# Altium PCB PCB.PcbDoc (part 3 of 7)
Units mm, origin at the board's own origin, x right, y up, seen from the top; angles counter-clockwise.
Board outline 78.8 x 69 mm, 12 copper layers (Top Layer, GND_12, uStrip1, GND_35, Clocks, GND_57, POWER, Slow_Ctrl, GND_810, uStrip2, GND_1012, Bottom Layer), stack 2.926 mm thick; 290 components, 212 nets, 1379 pads, 3418 vias.
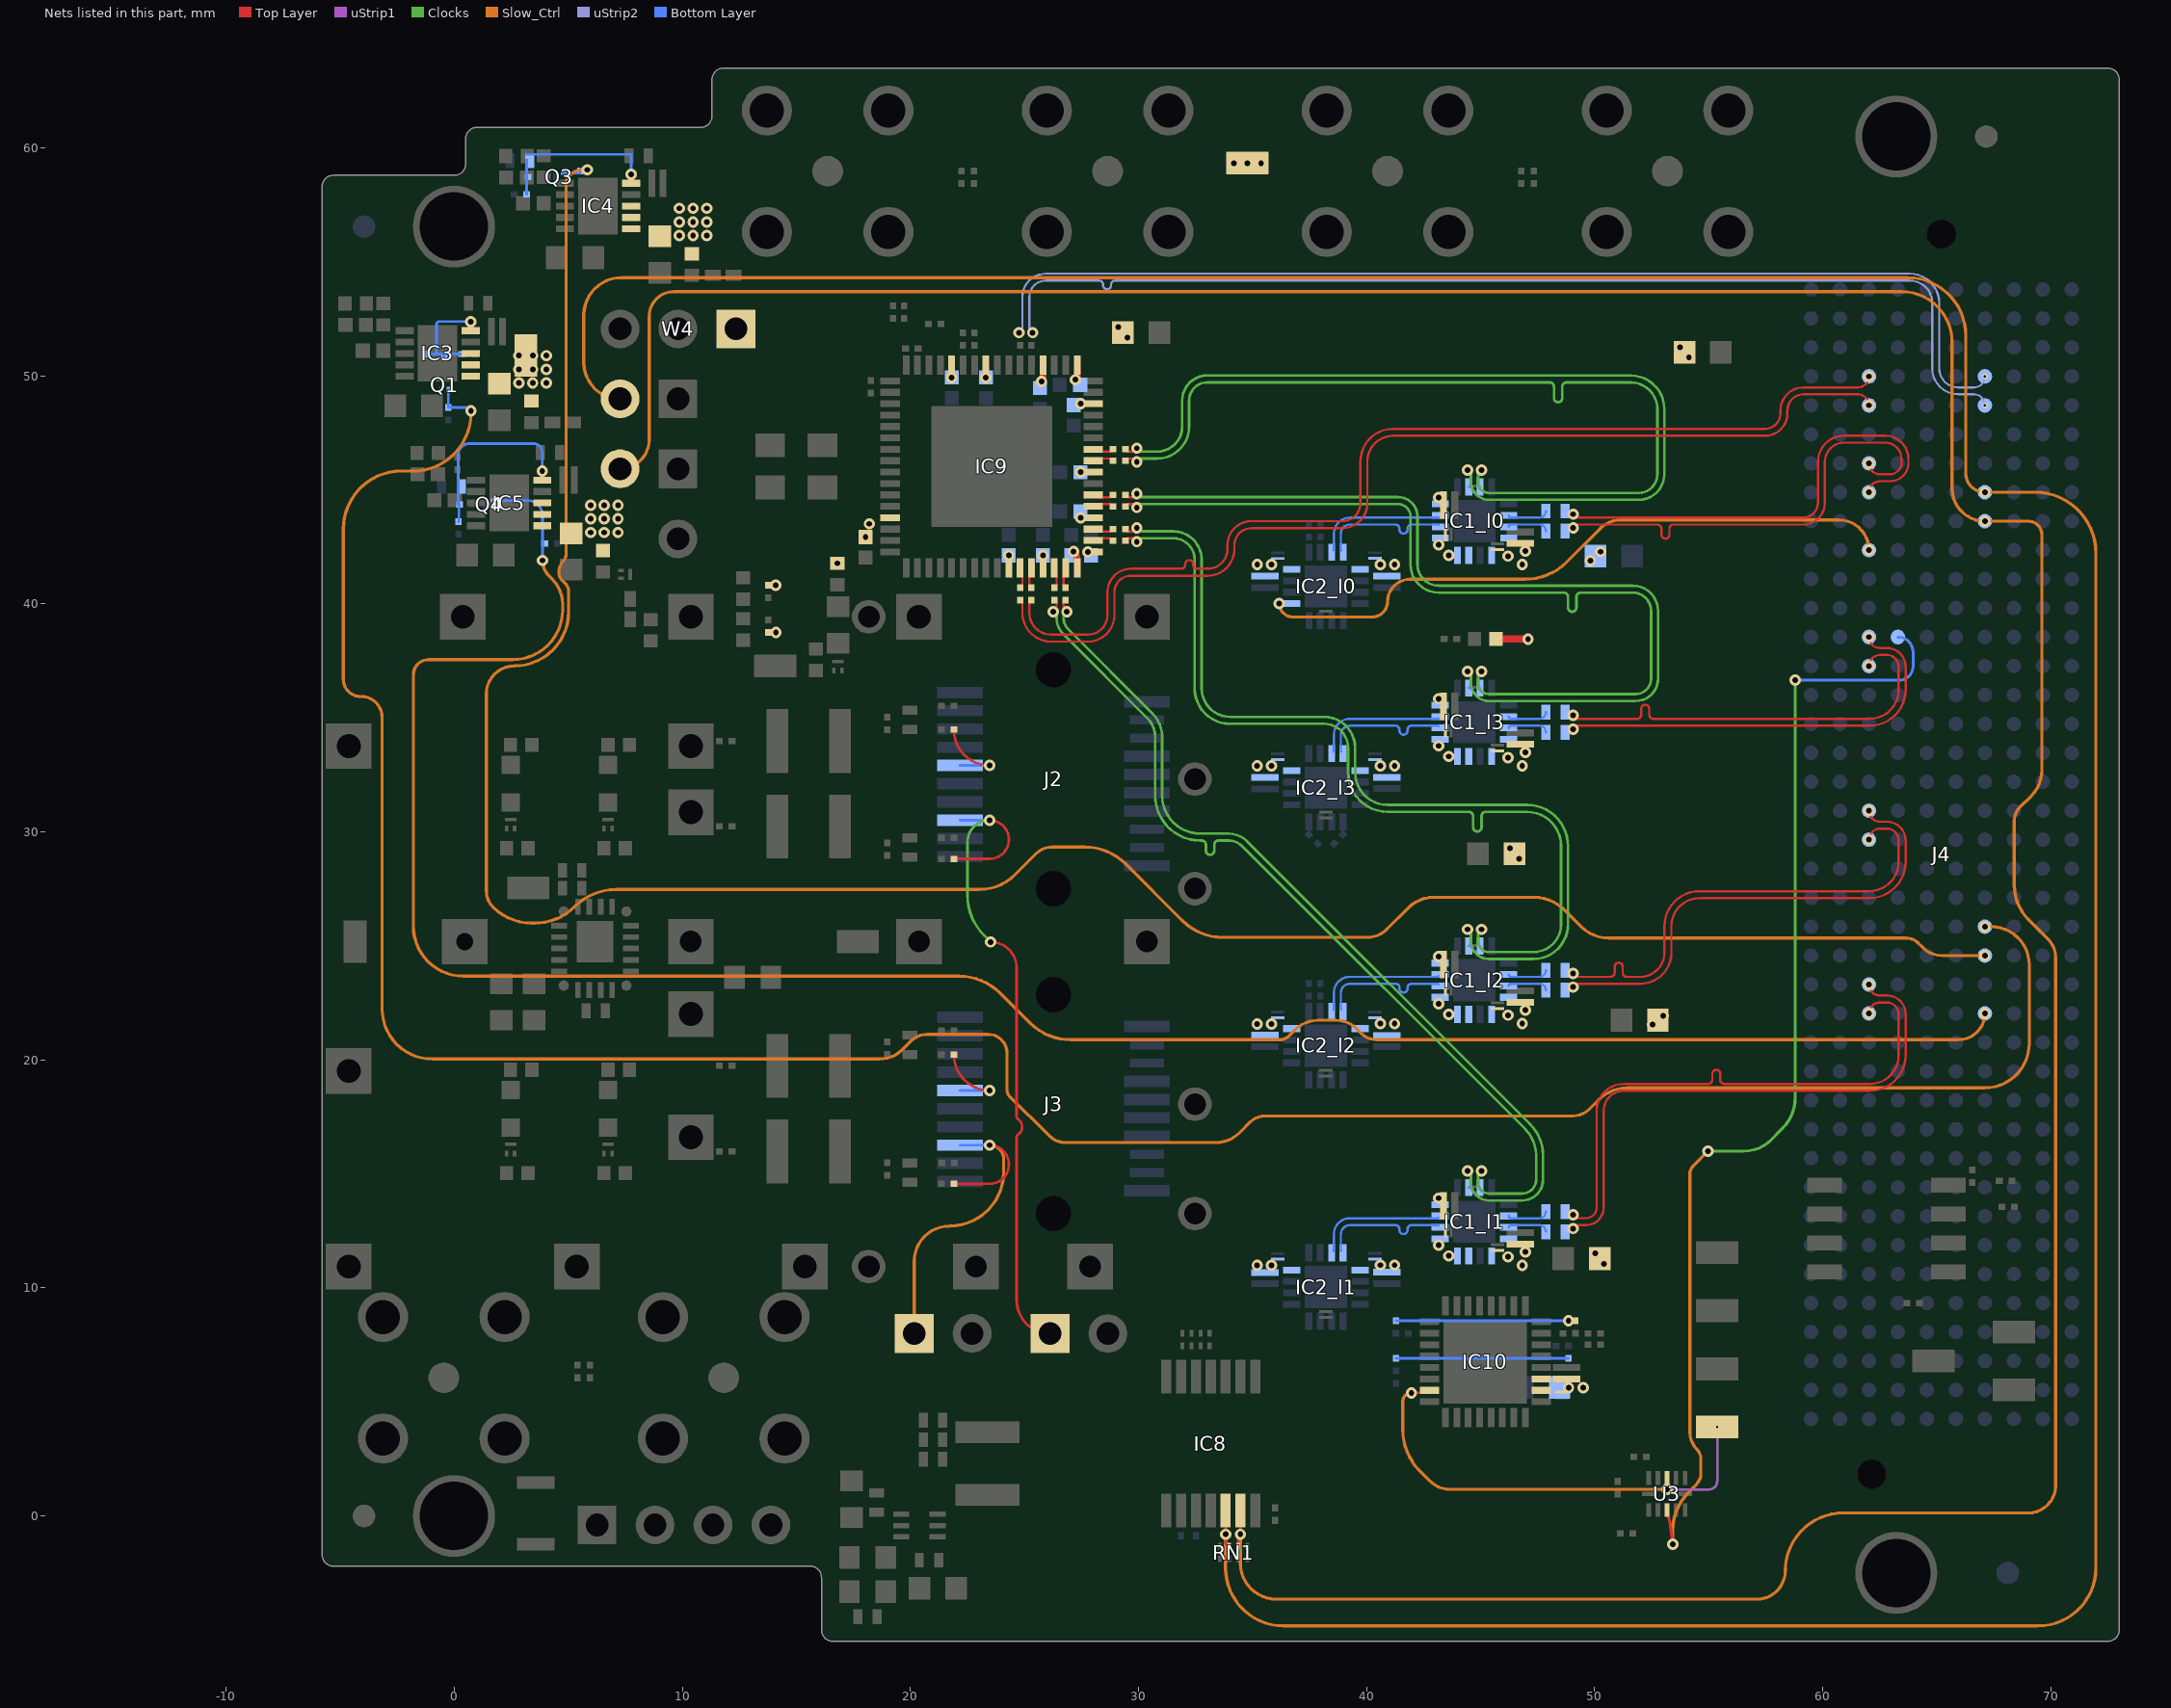
[diagram p12: the nets of this part, all layers, seen from the top]

## Via types
v1: diameter 0.25, hole 0.1, Top Layer to uStrip1, tented both sides, 895 vias
v2: diameter 0.25, hole 0.1, uStrip2 to Bottom Layer, tented both sides, 888 vias
v3: diameter 0.5, hole 0.25, Top Layer to Bottom Layer, tented both sides, 768 vias
v4: diameter 0.5, hole 0.25, Top Layer to Bottom Layer, 545 vias
v5: diameter 0.5, hole 0.25, uStrip1 to uStrip2, tented both sides, 315 vias
v6: diameter 0.584, hole 0.483, Top Layer to Bottom Layer, tented both sides, 6 vias
v7: diameter 0.5, hole 0.25, uStrip1 to uStrip2, 1 vias

## Nets (pads, with @x,y where several pads share a name; then routed paths per layer and width w, separated by ;. In a path a pad name is that pad's centre, name@x,y a point inside that pad or via, vN(x,y) a via of type N, cw(c..) or ccw(c..) an arc to the next point about the centre after c; other vN are vias at no path point) (continued)
DFF_IN_l0_P: (continued)
  Bottom Layer w0.099: IC2_l0.12@38.896,42.339 38.872,42.364 38.872,42.79 38.872,43.081 cw(c39.272,43.081) 39.272,43.481 40.864,43.481 41.266,43.481 cw(c41.266,43.305) 41.443,43.305 41.443,43.266 ccw(c41.619,43.266) 41.796,43.266 41.796,43.305 cw(c41.973,43.305) 41.973,43.481 42.386,43.481 43.132,43.481 IC1_l0.2@43.156,43.457
DFF_IN_l1_N: IC1_l1.3 IC2_l1.11 | length 5.8
  Bottom Layer w0.099: IC2_l1.11@38.541,11.612 38.565,11.637 38.565,12.189 38.565,12.354 cw(c39.27,12.354) 39.27,13.059 43.13,13.059 IC1_l1.3@43.155,13.084
DFF_IN_l1_P: IC1_l1.2 IC2_l1.12 | length 5.8
  Bottom Layer w0.099: IC2_l1.12@38.895,11.612 38.87,11.637 38.87,12.063 38.87,12.354 cw(c39.27,12.354) 39.27,12.754 40.862,12.754 41.265,12.754 cw(c41.265,12.578) 41.442,12.578 41.442,12.54 ccw(c41.618,12.54) 41.795,12.54 41.795,12.578 cw(c41.971,12.578) 41.971,12.754 42.384,12.754 43.13,12.754 IC1_l1.2@43.155,12.73
DFF_IN_l2_N: IC1_l2.3 IC2_l2.11 | length 5.8
  Bottom Layer w0.099: IC2_l2.11@38.541,22.202 38.565,22.227 38.565,22.779 38.565,22.944 cw(c39.27,22.944) 39.27,23.649 43.13,23.649 IC1_l2.3@43.155,23.674
DFF_IN_l2_P: IC1_l2.2 IC2_l2.12 | length 5.8
  Bottom Layer w0.099: IC2_l2.12@38.895,22.202 38.87,22.227 38.87,22.653 38.87,22.944 cw(c39.27,22.944) 39.27,23.344 40.862,23.344 41.265,23.344 cw(c41.265,23.168) 41.442,23.168 41.442,23.129 ccw(c41.618,23.129) 41.795,23.129 41.795,23.168 cw(c41.971,23.168) 41.971,23.344 42.384,23.344 43.13,23.344 IC1_l2.2@43.155,23.32
DFF_IN_l3_N: IC1_l3.3 IC2_l3.11 | length 5.8
  Bottom Layer w0.099: IC2_l3.11@38.541,33.516 38.565,33.541 38.565,34.093 38.565,34.258 cw(c39.27,34.258) 39.27,34.963 43.13,34.963 IC1_l3.3@43.155,34.988
DFF_IN_l3_P: IC1_l3.2 IC2_l3.12 | length 5.8
  Bottom Layer w0.099: IC2_l3.12@38.895,33.516 38.87,33.541 38.87,33.967 38.87,34.258 cw(c39.27,34.258) 39.27,34.658 40.862,34.658 41.265,34.658 cw(c41.265,34.482) 41.442,34.482 41.442,34.443 ccw(c41.618,34.443) 41.795,34.443 41.795,34.482 cw(c41.971,34.482) 41.971,34.658 42.384,34.658 43.13,34.658 IC1_l3.2@43.155,34.634
DIS0: J2.3 R30.1 W1.1 | length 30.5
  Top Layer w0.117: R30.1@21.959,28.818 23.171,28.818 23.472,28.819 23.474,28.819 ccw(c23.472,29.667) 23.473,30.515 v3(23.471,30.515) ; v3(23.518,25.176) cw(c23.518,24.035) 24.66,24.035 24.66,17.504 ccw(c24.776,17.505) 24.712,17.408 cw(c24.487,17.065) 24.73,17.395 cw(c24.487,17.065) 24.875,16.932 cw(c24.487,17.065) 24.712,16.722 ccw(c24.776,16.625) 24.66,16.626 24.66,9.462 ccw(c26.119,9.462) W1.1@26.119,8.003
  Clocks w0.117: v3(23.471,30.515) ccw(c23.471,29.539) 22.495,29.539 22.495,27.251 ccw(c25.035,27.251) 23.239,25.455 v3(23.518,25.176)
  Bottom Layer w0.117: J2.3@22.171,30.515 v3(23.471,30.515)
DIS1: J3.3 R38.1 W2.1 | length 16.3
  Top Layer w0.117: R38.1@21.959,14.568 23.171,14.568 23.472,14.569 23.474,14.569 ccw(c23.472,15.417) 23.473,16.265 v3(23.471,16.265)
  Slow_Ctrl w0.137: W2.1@20.164,8.007 20.164,11.162 cw(c21.72,11.162) 21.72,12.718 ccw(c21.72,15.085) 24.087,15.085 24.087,15.649 ccw(c23.471,15.649) v3(23.471,16.265)
  Bottom Layer w0.117: J3.3@22.171,16.265 v3(23.471,16.265)
DMTD_CLK_0_N: C80.2 IC1_l0.7 | length 40.9
  Top Layer w0.099: C80.2@29.426,46.281 cw(c29.524,46.281) 29.524,46.378 29.778,46.378 cw(c29.778,46.23) v3(29.926,46.23)
  Clocks w0.114: v3@29.926,46.378 30.819,46.378 ccw(c30.819,47.778) 32.219,47.778 32.219,48.927 cw(c33.008,48.927) 33.008,49.716 ; v3@30.046,46.349 30.092,46.303 v3@30.105,46.303 ; 33.034,49.716 47.629,49.716 ; v3@44.882,45.865 44.882,45.349 ccw(c45.36,45.349) 45.36,44.871 51.935,44.871 ccw(c51.935,45.687) 52.75,45.687 52.75,48.543 ccw(c51.577,48.543) 51.577,49.716 49.473,49.716 48.766,49.716 ccw(c48.766,49.532) 48.582,49.532 48.582,49.033 cw(c48.398,49.033) 48.214,49.033 48.214,49.532 ccw(c48.029,49.532) 48.029,49.716 47.604,49.716 ; v3@44.91,45.739 v3@44.962,45.688
  Bottom Layer w0.099: IC1_l0.7@44.979,45.134 cw(c44.979,45.207) 44.906,45.207 44.906,45.735 cw(c45.036,45.735) v3(45.036,45.865)
DMTD_CLK_0_P: C78.2 IC1_l0.6 | length 40.9
  Top Layer w0.099: C78.2@29.426,46.78 ccw(c29.524,46.78) 29.524,46.683 29.778,46.683 ccw(c29.778,46.831) v3(29.926,46.831)
  Clocks w0.114: v3@29.926,46.683 30.819,46.683 ccw(c30.819,47.778) 31.914,47.778 31.914,48.927 cw(c33.008,48.927) 33.008,50.021 51.577,50.021 cw(c51.577,48.543) 53.055,48.543 53.055,45.687 cw(c51.935,45.687) 51.935,44.567 45.36,44.567 cw(c45.36,45.349) 44.577,45.349 v3@44.577,45.865 ; v3@30.046,46.711 30.092,46.757 v3@30.105,46.757 ; v3@44.497,45.688 v3@44.548,45.739
  Bottom Layer w0.099: v3(44.423,45.865) cw(c44.423,45.735) 44.552,45.735 44.552,45.207 cw(c44.479,45.207) IC1_l0.6@44.479,45.134
DMTD_CLK_1_N: C86.2 IC1_l1.7 | length 40.9
  Top Layer w0.099: v3(26.258,39.662) ccw(c26.258,39.811) 26.406,39.811 26.406,40.065 ccw(c26.309,40.065) C86.2@26.309,40.162
  Clocks w0.114: v3@26.332,39.497 v3@26.378,39.543 ; 26.412,39.364 ccw(c27.379,39.366) 26.694,38.684 30.402,34.975 cw(c29.617,34.19) 30.727,34.19 30.727,31.605 ccw(c32.709,31.605) 32.252,29.677 ccw(c32.709,31.605) 32.309,29.664 32.436,29.642 32.709,29.624 32.769,29.624 cw(c32.769,29.439) 32.954,29.439 32.954,29.181 ccw(c33.138,29.181) 33.322,29.181 33.322,29.439 cw(c33.506,29.439) 33.506,29.624 33.837,29.624 33.947,29.624 cw(c33.947,28.774) 33.977,29.623 cw(c33.947,28.774) 34.114,29.607 cw(c33.947,28.774) 34.544,29.379 34.546,29.377 34.668,29.254 46.953,16.969 cw(c45.797,15.813) 47.432,15.813 47.432,14.75 cw(c46.826,14.75) 46.826,14.144 45.358,14.144 cw(c45.358,14.622) 44.88,14.622 v3@44.88,15.138 ; 26.412,39.366 v3@26.412,39.662 ; v3@44.909,15.012 v3@44.961,14.961
  Bottom Layer w0.099: IC1_l1.7@44.978,14.407 cw(c44.978,14.48) 44.905,14.48 44.905,15.009 cw(c45.035,15.009) v3(45.035,15.138)
DMTD_CLK_1_P: C85.2 IC1_l1.6 | length 40.9
  Top Layer w0.099: C85.2@26.808,40.162 ccw(c26.808,40.065) 26.711,40.065 26.711,39.811 ccw(c26.859,39.811) v3(26.859,39.662)
  Clocks w0.114: v3@26.717,39.662 26.717,39.366 ccw(c27.379,39.366) 26.911,38.898 30.618,35.191 cw(c29.617,34.19) 31.032,34.19 31.032,31.605 ccw(c32.709,31.605) 32.709,29.928 33.947,29.928 cw(c33.947,28.774) 34.763,29.59 34.973,29.38 47.167,17.186 ; v3@26.74,39.543 v3@26.786,39.497 ; v3@44.495,14.961 v3@44.547,15.012 ; v3@44.576,15.138 44.576,14.622 ccw(c45.358,14.622) 45.358,13.84 46.826,13.84 ccw(c46.826,14.75) 47.737,14.75 47.737,15.813 ccw(c45.797,15.813) 47.167,17.186
  Bottom Layer w0.099: v3(44.421,15.138) cw(c44.421,15.009) 44.551,15.009 44.551,14.48 cw(c44.478,14.48) IC1_l1.6@44.478,14.407
DMTD_CLK_2_N: C84.2 IC1_l2.7 | length 40.7
  Top Layer w0.099: C84.2@29.426,42.781 cw(c29.524,42.781) 29.524,42.878 29.778,42.878 cw(c29.778,42.73) v3(29.926,42.73)
  Clocks w0.114: v3@29.926,42.878 31.533,42.878 cw(c31.533,41.951) 32.46,41.951 32.46,36.303 ccw(c34.02,36.303) 34.02,34.743 38.14,34.743 cw(c38.14,33.691) 39.192,33.691 39.192,32.613 ccw(c40.923,32.613) 40.923,30.882 44.06,30.882 44.486,30.882 cw(c44.486,30.698) 44.67,30.698 44.67,30.202 ccw(c44.854,30.202) 45.038,30.202 45.038,30.698 cw(c45.223,30.698) 45.223,30.882 45.901,30.882 47.033,30.882 cw(c47.033,29.39) 48.525,29.39 48.525,25.941 cw(c47.319,25.941) 47.319,24.734 45.705,24.734 45.358,24.734 cw(c45.358,25.212) 44.88,25.212 v3@44.88,25.728
  Bottom Layer w0.099: IC1_l2.7@44.978,24.997 cw(c44.978,25.07) 44.905,25.07 44.905,25.598 cw(c45.035,25.598) v3(45.035,25.728)
DMTD_CLK_2_P: C83.2 IC1_l2.6 | length 40.7
  Top Layer w0.099: C83.2@29.426,43.28 ccw(c29.524,43.28) 29.524,43.183 29.778,43.183 ccw(c29.778,43.331) v3(29.926,43.331)
  Clocks w0.114: v3@29.926,43.183 31.533,43.183 cw(c31.533,41.951) 32.765,41.951 32.765,36.303 ccw(c34.02,36.303) 34.02,35.047 38.14,35.047 cw(c38.14,33.691) 39.497,33.691 39.497,32.613 ccw(c40.923,32.613) 40.923,31.187 47.033,31.187 cw(c47.033,29.39) 48.83,29.39 48.83,25.941 cw(c47.319,25.941) 47.319,24.43 45.578,24.43 45.358,24.43 cw(c45.358,25.212) 44.576,25.212 v3@44.576,25.728
  Bottom Layer w0.099: v3(44.421,25.728) cw(c44.421,25.598) 44.551,25.598 44.551,25.07 cw(c44.478,25.07) IC1_l2.6@44.478,24.997
DMTD_CLK_3_N: C82.2 IC1_l3.7 | length 40.8
  Top Layer w0.099: C82.2@29.426,44.281 cw(c29.524,44.281) 29.524,44.378 29.778,44.378 cw(c29.778,44.23) v3(29.926,44.23)
  Clocks w0.114: v3@29.926,44.378 41.386,44.378 cw(c41.386,43.839) 41.925,43.839 41.925,41.731 ccw(c43.158,41.731) 43.158,40.497 48.226,40.497 48.65,40.497 cw(c48.65,40.313) 48.834,40.312 48.831,39.845 ccw(c49.015,39.844) 49.014,39.66 ccw(c49.015,39.844) 49.199,39.842 49.202,40.314 cw(c49.387,40.313) 49.387,40.497 49.78,40.497 51.674,40.497 cw(c51.674,39.696) 52.476,39.696 52.476,36.73 cw(c51.795,36.73) 51.795,36.048 45.358,36.048 cw(c45.358,36.526) 44.88,36.526 v3@44.88,37.042 ; v3@30.046,44.349 30.092,44.303 v3@30.105,44.303
  Bottom Layer w0.099: IC1_l3.7@44.978,36.311 cw(c44.978,36.384) 44.905,36.384 44.905,36.913 cw(c45.035,36.913) v3(45.035,37.042)
DMTD_CLK_3_P: C81.2 IC1_l3.6 | length 40.9
  Top Layer w0.099: C81.2@29.426,44.78 ccw(c29.524,44.78) 29.524,44.683 29.778,44.683 ccw(c29.778,44.831) v3(29.926,44.831)
  Clocks w0.114: v3@29.926,44.683 41.386,44.683 cw(c41.386,43.839) 42.229,43.839 42.229,41.731 ccw(c43.158,41.731) 43.158,40.802 51.674,40.802 cw(c51.674,39.696) 52.781,39.696 52.781,36.73 cw(c51.795,36.73) 51.795,35.744 45.358,35.744 cw(c45.358,36.526) 44.576,36.526 v3@44.576,37.042 ; v3@30.046,44.711 30.092,44.757 v3@30.105,44.757
  Bottom Layer w0.099: v3(44.421,37.042) cw(c44.421,36.913) 44.551,36.913 44.551,36.384 cw(c44.478,36.384) IC1_l3.6@44.478,36.311
DMTD_CLK_FPGA_N: C92.2 J4.H5 | length 46.3
  Top Layer w0.099: C92.2@24.809,40.162 cw(c24.809,40.065) 24.906,40.065 24.906,39.612 ccw(c26.168,39.612) 26.168,38.349 27.782,38.349 ccw(c27.782,39.508) 28.94,39.508 28.94,40.511 cw(c29.668,40.511) 29.668,41.239 33.034,41.239 ccw(c33.034,42.411) 34.206,42.411 34.206,42.587 cw(c34.944,42.587) 34.944,43.325 38.938,43.325 ccw(c38.938,44.421) 40.034,44.421 40.034,46.249 cw(c41.16,46.249) 41.16,47.375 57.469,47.375 ccw(c57.469,48.356) 58.451,48.356 58.451,48.486 cw(c59.157,48.486) 59.157,49.193 59.832,49.193 61.545,49.193 cw(c61.545,48.71) v3(62.028,48.71)
DMTD_CLK_FPGA_P: C91.2 J4.H4 | length 46.4
  Top Layer w0.099: C91.2@25.308,40.162 ccw(c25.308,40.065) 25.211,40.065 25.211,39.612 ccw(c26.168,39.612) 26.168,38.654 27.782,38.654 ccw(c27.782,39.508) 28.635,39.508 28.635,40.511 cw(c29.668,40.511) 29.668,41.544 31.633,41.544 31.87,41.544 ccw(c31.87,41.72) 32.046,41.72 32.046,41.746 cw(c32.223,41.746) 32.399,41.746 32.399,41.72 ccw(c32.576,41.72) 32.576,41.544 32.979,41.544 33.034,41.544 ; 33.213,41.562 cw(c33.04,42.362) 33.04,41.544 33.034,41.544 ; v3(62.028,49.98) cw(c61.545,49.98) 61.545,49.497 59.959,49.497 59.157,49.497 ccw(c59.157,48.486) 58.146,48.486 58.146,48.356 cw(c57.469,48.356) 57.469,47.68 41.16,47.68 ccw(c41.16,46.249) 39.73,46.249 39.73,44.421 cw(c38.938,44.421) 38.938,43.629 34.944,43.629 ccw(c34.944,42.587) 33.901,42.587 33.901,42.411 cw(c33.034,42.411) 33.034,41.544
EQ0_EN: IC2_l0.5 J4.H10 | length 28.8
  Slow_Ctrl w0.137: v3(36.174,40.018) ccw(c36.763,40.018) 36.763,39.429 40.251,39.429 ccw(c40.251,40.094) 40.916,40.094 cw(c41.904,40.094) 41.904,41.082 46.962,41.082 ccw(c46.962,43.622) 48.758,41.826 50.244,43.313 cw(c51.144,42.412) 51.144,43.685 60.702,43.685 cw(c60.702,42.36) v3(62.028,42.36)